# EAGLE board bom_four (EAGLE 9.6.2)

Size 30 x 20 mm. Coordinates in mm from the lower left corner, seen from the top.
Outline: 0,0 30,0 30,20 0,20 0,0
Copper layers used: 

## Footprints (pad centres in the part's own frame; a part is rotated, then mirrored left to right if it is on the bottom)
R0805 = smd 1 x 1.3: 1 -1,0; 2 1,0

## Placement (x,y rotation side)
R1  10k  [R0805]  6,6 0 top
R2  10k  [R0805]  14,6 0 top
R3  10k  [R0805]  22,6 0 top
R4  4k7  [R0805]  6,14 0 top

## Library data of the parts
R1-R4 = guide